# EAGLE board Garden_Irrigation_System (EAGLE 9.7.0)

Size 139.16 x 128.81 mm. Coordinates in mm from the lower left corner, seen from the top.
Outline: 0,0 139.16,0 139.16,128.81 0,128.81 0,0
Copper layers (1*16): Top 0.035mm / dielectric 1.5mm / Bottom 0.035mm
Design rules "default": minimum track width 6mil, minimum drill 0.35mm, track to track 6mil, track to pad 6mil, pad to pad 6mil, via to via 6mil, smd to smd 6mil, copper to edge 40mil, drill to drill 6mil, minimum pad ring 10mil, minimum via ring 8mil, stop-mask expansion 4mil, vias tented up to drill 0mil, thermal gap 10mil

## Footprints (pad centres in the part's own frame; a part is rotated, then mirrored left to right if it is on the bottom)
DIODE-AXIAL = drill 1: 1 -5.08,0; 2 5.08,0
LEDRD254W60D565H860B_G = drill 0.981 pad 1.581: 1 -1.27,0; 2 1.27,0
LEDRD254W60D565H860B = drill 0.981 pad 1.581: 1 -1.27,0; 2 1.27,0
LU-5-R = drill 0.8: 1 -6.35,-3.81; 5 3.81,-3.81; 6 6.35,-3.81; 7 6.35,3.81; 8 3.81,3.81; 12 -6.35,3.81
MOTOR = drill 1.118 pad 3.15 octagon: + 2.54,0; - -2.54,0
BATTERY-GENERIC = drill 1.118 pad 3.15 octagon: + 2.54,0; - -2.54,0
RESAD1016W63L850D250B = drill 0.83 pad 1.43: 1 -5.08,0; 2 5.08,0
SEN-13322 = drill 1.016 long: 1 -2.54,0; 2 0,0; 3 2.54,0
ARDUINO-UNO-R3-SHIELD = drill 1.016 pad 1.88: 3.3V 24.13,-2.54; 5V 24.13,0; A0 24.13,12.7; A1 24.13,15.24; A2 24.13,17.78; A3 24.13,20.32; A4 24.13,22.86; A5 24.13,25.4; AREF -24.13,-13.97; D2 -24.13,20.32; D3 -24.13,17.78; D4 -24.13,15.24; D5 -24.13,12.7; D6 -24.13,10.16; D7 -24.13,7.62; D8 -24.13,3.81; D9 -24.13,1.27; D10 -24.13,-1.27; D11 -24.13,-3.81; D12 -24.13,-6.35; D13 -24.13,-8.89; GND@0 24.13,2.54; GND@1 24.13,5.08; GND@2 -24.13,-11.43; IOREF 24.13,-7.62; NC 24.13,-10.16; RES 24.13,-5.08; RX -24.13,25.4; SCL -24.13,-19.05; SDA -24.13,-16.51; TX -24.13,22.86; VIN 24.13,7.62

## Placement (x,y rotation side)
D2  DIODEDIODE-AXIAL  [DIODE-AXIAL]  34.34,26.95 270 top
DGREEN_SIGNAL  GREEN  [LEDRD254W60D565H860B_G]  22.07,98.09 180 top
DRED_SIGNAL  RED  [LEDRD254W60D565H860B]  9.04,96.82 180 top
KRELAY  RELAY-SPDT_LU-5-R  [LU-5-R]  87.7,88.8 180 top
MPUMP  MOTOR_HDR  [MOTOR]  104.15,120.55 0 top
PPOWER_SUPPLY  BATTERYGENERIC  [BATTERY-GENERIC]  72.61,117.27 180 top
R1  0.5k  [RESAD1016W63L850D250B]  7.77,91.74 90 top
R2  1k  [RESAD1016W63L850D250B]  20.8,93.01 90 top
SENSOIL_SENSOR  SEN-13322  [SEN-13322]  132.17,61.3 0 top
UARDUINO  ARDUINO-UNO-R3-SHIELD  [ARDUINO-UNO-R3-SHIELD]  47.88,29.84 270 top

## Library data of the parts
D2 KRELAY MPUMP PPOWER_SUPPLY R1 R2 SENSOIL_SENSOR UARDUINO = Tinkercad
DGREEN_SIGNAL = Tinkercad; CATEGORY: Opto-Electronic; SUB-CATEGORY: LED; VALUE: LED_GREEN
DRED_SIGNAL = Tinkercad; CATEGORY: Opto-Electronic; SUB-CATEGORY: LED; VALUE: LED_RED

## Nets
DGREEN_SIGNAL_C: DGREEN_SIGNAL.2 R2.2
DRED_SIGNAL_C: DRED_SIGNAL.2 R1.2
MPUMP_+: KRELAY.6 MPUMP.+
PPOWER_SUPPLY+: KRELAY.12 PPOWER_SUPPLY.+
PPOWER_SUPPLY-: MPUMP.- PPOWER_SUPPLY.-
UARDUINO_5V: SENSOIL_SENSOR.1 UARDUINO.5V
UARDUINO_A1: SENSOIL_SENSOR.3 UARDUINO.A1
UARDUINO_D2: DGREEN_SIGNAL.1 UARDUINO.D2
UARDUINO_D3: DRED_SIGNAL.1 KRELAY.8 UARDUINO.D3
UARDUINO_GND: KRELAY.5 R1.1 R2.1 SENSOIL_SENSOR.2 UARDUINO.GND@0 UARDUINO.GND@1 UARDUINO.GND@2

## Tracks (layer width: path | path; a pad name or v marks a point on that pad's centre or on a via)
DGREEN_SIGNAL_C  (1 unrouted)
DRED_SIGNAL_C  (1 unrouted)
MPUMP_+  (1 unrouted)
PPOWER_SUPPLY+  (1 unrouted)
PPOWER_SUPPLY-  (1 unrouted)
UARDUINO_5V  (1 unrouted)
UARDUINO_A1  (1 unrouted)
UARDUINO_D2  (1 unrouted)
UARDUINO_D3  (2 unrouted)
UARDUINO_GND  (6 unrouted)